# Altium PCB TIE_2025.PcbDoc (part 2 of 2)
Units mm, origin at the board's own origin, x right, y up, seen from the top; angles counter-clockwise.
Board outline 85 x 56.03 mm, 6 copper layers (Top Layer, L2-GND, L3-PWR, L4-SGN, L5-GND, Bottom Layer), stack 1.452 mm thick; 135 components, 108 nets, 850 pads, 109 vias.
Unrouted connection lines stored in the file: 482.
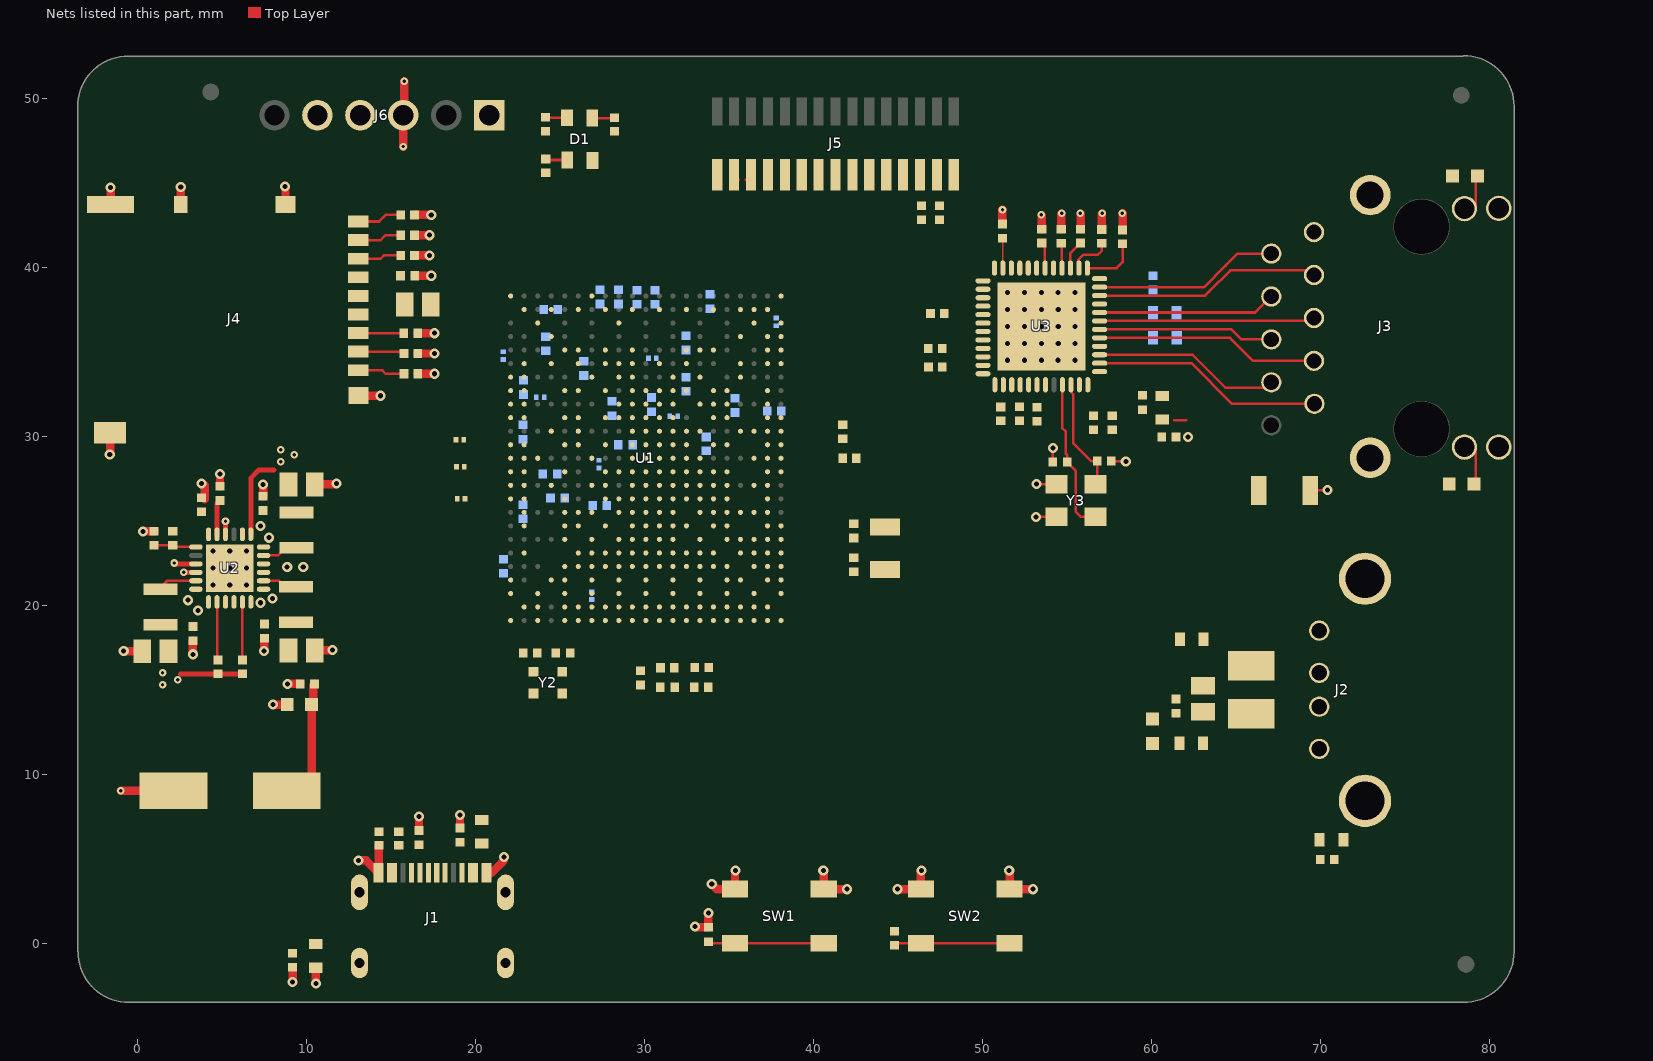
[diagram p5: the nets of this part, all layers, seen from the top]

## Part data
C1 C3 C7 C13 C14 C15 C16 C17 C19 C20 C21 C22 C23 C24 C25 C26 C27 C28 C31 C34 C37 C39 C48 C49 C50 C51 C52 C56 C59: library part C0402C104K4RAC7867, "CAP CER 0.1uF 16V 10% X7R SMD 0402", Manufacturer=KEMET, Package=0402, Rated Voltage=16V, .Checked_PCB=AI, .Checked_SCH=AI, .Creator=AI, Manufacturer Part Number=C0402C104K4RAC7867
C2 C8 C53 C54: library part QSCF500Q100J1GV001T, "CAP CER 10pF 50V 5% C0G/NP0 SMD 0402", Manufacturer="Johanson Technology", Package=0402, Rated Voltage=50V, .Checked_PCB=AI, .Checked_SCH=AI, .Creator=AI, Manufacturer Part Number=QSCF500Q100J1GV001T
C4 C9 C10 C11 C12 C40 C42 C44 C46 C47: library part C1005X5R1A475K050BC, "CAP CER 4.7uF 10V 10% X5R SMD 0402", Manufacturer="TDK Corporation", Package=0402, Rated Voltage=10V, .Checked_PCB=AI, .Checked_SCH=AI, .Creator=AI, Manufacturer Part Number=C1005X5R1A475K050BC
C5 C6: library part QSCF500Q120J1GV001T, "CAP CER 12pF 50V 5% C0G/NP0 SMD 0402", Manufacturer="Johanson Technology", Package=0402, Rated Voltage=50V, .Checked_PCB=AI, .Checked_SCH=AI, .Creator=AI, Manufacturer Part Number=QSCF500Q120J1GV001T
C18 C58: library part GRM155C71A225KE11J, "CAP CER 2.2uF 10V 10% X7S SMD 0402", Manufacturer=Murata, Package=0402, Rated Voltage=10V, .Checked_PCB=AI, .Checked_SCH=AI, .Creator=AI, Manufacturer Part Number=GRM155C71A225KE11J
C29: library part UWT1E331MNL1GS, "CAP ALU 330uF 25V 20% SMD F", Manufacturer=Nichicon, Rated Voltage=25V, Manufacturer Part Number=UWT1E331MNL1GS
C30 C38: library part GRT188R61C106KE13D, "CAP CER 10uF 16V 10% X5R SMD 0603 AEC-Q200", Manufacturer=Murata, Rated Voltage=16V, .Checked_PCB=IC, .Checked_SCH=IC, .Creator=IC, Manufacturer Part Number=GRT188R61C106KE13D, Pacakage=0603
C32 C33: library part GRM1555C1H471JA01D, "CAP CER 470pF 50V 5% NP0 SMD 0402", Manufacturer=Murata, Package=0402, Rated Voltage=50V, .Checked_PCB=AI, .Checked_SCH=AI, .Creator=AI, Manufacturer Part Number=GRM1555C1H471JA01D
C35: library part GRM32ER61A107ME20L, "CAP CER 100uF 10V 20% X5R SMD 1210", Manufacturer="Murata Electronics North", Package=1210, Rated Voltage=10V, .Checked_PCB=IC, .Checked_SCH=IC, Manufacturer Part Number=GRM32ER61A107ME20L
C36 C41 C43 C45 C57: library part C2012X7S1A226M125AC, "CAP CER 22uF 10V 20% X7S SMD 0805", Manufacturer="TDK Corporation", Package=0805, Rated Voltage=10V, Manufacturer Part Number=C2012X7S1A226M125AC
C55: library part 202R18W102KV4E, "CAP CER 1000pF 2KV 10% X7R SMD 1206", Manufacturer="D3_Johanson Dielectrics Inc", Rated Voltage=2kV, .Checked_PCB=AI, .Checked_SCH=AI, .Creator=AI, Manufacturer Part Number=202R18W102KV4E
D1: library part CLV1A-FKB-CK1VW1DE1BB7C3C3, "DIO LED TRI RED, GREEN, BLUE 2V, 3.2V, 3.2V 20mA, 20mA,  / 20mA SMD 4-PLCC", Manufacturer="Cree Inc.", .Checked_PCB=IC, .Checked_SCH=IC, Manufacturer Part Number=CLV1A-FKB-CK1VW1DE1BB7C3C3
FB1 FB2 FB3 FB4 FB5 FB6 FB7 FB8: library part BLM18PG121SN1D, "FERRITE BEAD 120 OHM 0603 1LN", Manufacturer=Murata, .Checked_PCB=AI, .Checked_SCH=AI, .Creator=AI
  FB1 FB2 FB3 FB4 FB6 FB7 FB8: Manufacturer Part Number=BLM18PG121SN1D
J1: library part USB4105-GF-A, "CONN USB2.0 TYPE-C Female SMD/TH R/A", Manufacturer=GCT, Manufacturer Part Number=USB4105-GF-A
J2: library part 292303-1, "CON USB2.0 STD-A FEMALE TH R/A", Manufacturer="TE Connectivity AMP", Manufacturer Part Number=292303-1
J3: "CON MODULAR JACK RJ45 10/100/1000 MAGNETICS 2xLEDs  / SHIELD TH R/A", Manufacturer="Pulse Electronics", Manufacturer Part Number=JXD1-0019NL
J4: "CON FLASH microSD 8+2P Push-Push SMD", Manufacturer="Hirose Electric Co Ltd", Manufacturer Part Number=DM3AT-SF-PEJM5
J5: library part 1-1734248-5, "CON FPC 1mm 15P Female SMD VERT", Manufacturer="TE Connectivity AMP", Manufacturer Part Number=1-1734248-5
J6: library part 68001-106HLF, "CON HDR-2.54 Male 1x6 Gold 5.84MH TH VERT", Manufacturer=FCI, Manufacturer Part Number=68001-106HLF
L1 L2 L3: library part DFE252012P-1R5M=P2, "INDUCTOR 1.5uH 3.5A 20% SMD 1008", Manufacturer="Murata Electronics North", Manufacturer Part Number=DFE252012P-1R5M=P2, .Checked_PCB=AI, .Checked_SCH=AI, .Creator=AI
R1 R14 R15 R16 R17 R22 R23 R24 R25 R26 R27 R28 R29 R30 R31: library part ERJ-2RKF1002X, "RES TKF 10k 1% 1/10W SMD 0402", Manufacturer=Panasonic, Package=0402, Tolerance=1%, Manufacturer Part Number=ERJ-2RKF1002X
R2 R3 R4: library part CR0201-FW-2000GLF, "RES TKF 200R 1% 1/20W SMD 0201", Manufacturer="Bourns Inc.", Package=0201, Tolerance=1%, Manufacturer Part Number=CR0201-FW-2000GLF
R5 R6 R7 R8: library part ERJ-1GNF1692C, "RES TKF 16.9k 1% 1/20W SMD 0201", Manufacturer="Panasonic Electronic", Package=0201, Tolerance=1%, Manufacturer Part Number=ERJ-1GNF1692C
R9: library part RC0201FR-074K02L, "RES TKF 4.02k 1% 1/20W SMD 0201", Manufacturer=Yageo, Package=0201, Tolerance=1%, Manufacturer Part Number=RC0201FR-074K02L
R10 R11 R32 R33 R34 R35 R45 R46 R47: library part ERJ-2RKF1001X, "RES TKF 1k 1% 1/10W SMD 0402", Manufacturer=Panasonic, Package=0402, Tolerance=1%, Manufacturer Part Number=ERJ-2RKF1001X
R12 R13: library part RC0201FR-07240RL, "RES TKF 240R 1% 1/20W SMD 0201", Manufacturer=Yageo, Package=0201, Tolerance=1%, Manufacturer Part Number=RC0201FR-07240RL
R18 R19 R37 R38 R39 R40 R41 R42: library part ERJ-2RKF4702X, "RES TKF 47k 1% 1/10W SMD 0402 AEC-Q200", Manufacturer="Panasonic - ECG", Package=0402, Tolerance=1%, Manufacturer Part Number=ERJ-2RKF4702X
R20 R21: library part ERJ-3EKF3300V, "RES TKF 330R 1% 1/10W SMD 0603", Manufacturer=Panasonic, Package=0603, Tolerance=1%, .Checked_PCB=IC, .Checked_SCH=IC, .Creator=IC, Manufacturer Part Number=ERJ-3EKF3300V
R36: library part ERJ-2RKF6041X, "RES TKF 6.04k 1% 1/10W SMD 0402 AEC-Q200", Manufacturer="Panasonic Electronic", Package=0402, Tolerance=1%, Manufacturer Part Number=ERJ-2RKF6041X
R43 R44: library part ERJ-2RKF2201X, "RES TKF 2.2k 1% 1/10W SMD 0402", Manufacturer=Panasonic, Package=0402, Tolerance=1%, Manufacturer Part Number=ERJ-2RKF2201X
SW1 SW2: "SWITCH TACT SPST 12V 50mA PTS 647 SK38 SMTR2 LFSSMD", Arrow Part Number="PTS 647 SK38 SMTR2 LFS", Manufacturer=C&K, Arrow Price/Stock=https://www.arrow.com/en/products/pts-647-sk38-smtr2-lfs/ck?region=europe, Datasheet Link=https://datasheet.datasheetarchive.com/originals/distributors/Datasheets_SAMA/dda6c2a9a64375c9ffe9508ecade46cd.pdf, Height=3.8mm, Manufacturer Part Number="PTS 647 SK38 SMTR2 LFS"
U1: "MCHP MPU SiP 32-BIT Cortex-A7 1000MHz 128kB 2Gbit  / SAMA7G54D2G-I/4UB LFBGA-427", Manufacturer="Microchip Technology", Manufacturer Part Number=SAMA7G54DG-I/4UB
U2: "MCHP ANALOG PMIC SWITCHER Buck ADJ MCP16501TA-E/RMB  / QFN-24", Manufacturer="Microchip Technology", Manufacturer Part Number=MCP16501TA-E/RMB
U3: "MCHP INTERFACE ETHERNET LAN8840 QFN-48", Manufacturer="Microchip Technology", Manufacturer Part Number=LAN8840-V/PSA
Y1: library part VMK4-1EE-12-32K7680000TR, "MCHP CRYSTAL 32.768kHz 12.5pF VMK4-1EE-12-32K7680000TR  / SMD L2.0W1.2H0.5", Manufacturer="Microchip Technology", Manufacturer Part Number=VMK4-1EE-12-32K7680000TR
Y2: library part VXM8-9016-24M0000000, "MCHP CRYSTAL 24MHz 10pF VXM8-9016-24M000000 SMD  / L2.5W2H0.55", Manufacturer="Microchip Technology", Manufacturer Part Number=VXM8-9016-24M0000000
Y3: library part VXM7-1362-50M0000000, "MCHP CRYSTAL 50MHz VXM7-1362-50M0000000 SMD  / L3.2W2.5H0.8", Manufacturer="Microchip Technology", Manufacturer Part Number=VXM7-1362-50M0000000

## Via types
v1: diameter 0.6, hole 0.3, Top Layer to L2-GND, 40 vias
v2: diameter 0.5, hole 0.3, Top Layer to Bottom Layer, tented both sides, 34 vias
v3: diameter 0.45, hole 0.2, Top Layer to Bottom Layer, 18 vias
v4: diameter 0.6, hole 0.3, Top Layer to Bottom Layer, 11 vias
v5: diameter 0.6, hole 0.3, Top Layer to L3-PWR, 6 vias

## Nets (pads, with @x,y where several pads share a name; then routed paths per layer and width w, separated by ;. In a path a pad name is that pad's centre, name@x,y a point inside that pad or via, vN(x,y) a via of type N, cw(c..) or ccw(c..) an arc to the next point about the centre after c; other vN are vias at no path point)
5V_MAIN: C29.1 C30.2 C31.2 C38.2 C40.2 C42.2 C44.2 C46.2 FB1.2 FB3.2 U2.7 U2.12 U2.17 U2.21 U2.24 | length 10.8
  Top Layer w0.3: v3(2.2,22.5) 2.25,22.45 U2.21@3.475,22.45 ; U2.17@4.725,24.2 4.725,26.025 C46.2@4.9,26.2
  Top Layer w0.5: C29.1@8.825,9.025 9.495,9.025 10.32,9.85 C30.2@10.32,14.125 10.408,14.213 10.408,15.255 10.49,15.338 C31.2@10.49,15.35
  other v5: 3.6,19.7 7.3,20.15 3,20.3 8,20.4 7.8,24 7.3,24.7
CAM_GPIO0: J5.11 U1.T18
CAM_GPIO1: J5.12 U1.R21
CAM_TWCK: J5.13 R43.2 U1.D11
CAM_TWD: J5.14 R44.2 U1.A3
DBGU_RX: J6.4 U1.J20
DBGU_TX: J6.5 U1.G25
DDR_VREF: C3.1 C7.2 R10.1 R11.2 U1.E4 U1.R12
ETH_ISET: R36.2 U3.48
GMAC0_IRQ: R26.1 U1.F15 U3.39
GMAC0_MDC: U1.AA13 U3.37
GMAC0_MDIO: R25.1 U1.W15 U3.38
GMAC0_RX0: R32.2 U1.U17 U3.33
GMAC0_RX1: R33.2 U1.AA12 U3.32
GMAC0_RX2: R34.2 U1.T17 U3.30
GMAC0_RX3: R22.1 U1.AA16 U3.29
GMAC0_RXCK: R23.1 U1.Y14 U3.36
GMAC0_RXCTL: R35.2 U1.Y13 U3.34
GMAC0_TX0: U1.Y15 U3.19
GMAC0_TX1: U1.W13 U3.20
GMAC0_TX2: U1.AA14 U3.21
GMAC0_TX3: U1.AA15 U3.22
GMAC0_TXEN: U1.V15 U3.26
GMACH0_TXCK: U1.Y17 U3.25
GND: C1.1 C2.1 C4.1 C5.1 C6.1 C7.1 C8.1 C9.1 C10.1 C11.1 C12.1 C13.1 C14.1 C15.1 C16.1 C17.1 C18.1 C19.1 C20.1 C21.1 C22.1 C23.1 C24.1 C25.1 C26.1 C27.1 C28.1 C29.2 C30.1 C31.1 C32.1 C33.1 C34.2 C38.1 C40.1 C41.2 C42.1 C43.2 C44.1 C45.2 C46.1 C47.1 C48.1 C49.2 C50.2 C51.1 C52.2 C53.1 C54.1 C55.1 C56.1 C57.1 C58.1 C59.1 FB2.2 FB4.2 FB5.1 J1.A1/B12 J1.B1/A12 J3.1 J4.G1 J4.G2 J4.G3 J4.G5 J4.G6 J4.P6 J5.1 J5.4 J5.7 J5.10 J6.1 R2.2 R3.2 R4.2 R5.1 R6.1 R7.1 R8.1 R9.2 R11.1 R12.2 R13.2 R15.1 R19.2 R32.1 R33.1 R34.1 R35.1 R36.1 SW1.1 SW1.2 SW2.1 SW2.2 U1.A1 U1.A25 U1.AA1 U1.AA4 U1.AA6 U1.AA8 U1.AA25 U1.B2 U1.B16 U1.B24 U1.C3 U1.C23 U1.D4 U1.D20 U1.D22 U1.E2 U1.E5 U1.E8 U1.E10 U1.E12 U1.E14 U1.E16 U1.E18 U1.E21 U1.F1 U1.F9 U1.F20 U1.G2 U1.G3 U1.G5 U1.G7 U1.G9 U1.H1 U1.H5 U1.H8 U1.H10 U1.H14 U1.H16 U1.H18 U1.H21 U1.J1 U1.J3 U1.J5 U1.J7 U1.J9 U1.J10 U1.J16 U1.K2 U1.K8 U1.K10 U1.K11 U1.K13 U1.K15 U1.K21 U1.L1 U1.L3 U1.L5 U1.L7 U1.L8 U1.L12 U1.L14 U1.L16 U1.L17 U1.L18 U1.M2 U1.M5 U1.M6 U1.M8 U1.M11 U1.M13 U1.M15 U1.M17 U1.M18 U1.N1 U1.N2 U1.N4 U1.N7 U1.N9 U1.N10 U1.N12 U1.N14 U1.N16 U1.N18 U1.P2 U1.P5 U1.P8 U1.P11 U1.P13 U1.P18 U1.P24 U1.R1 U1.R3 U1.R6 U1.R7 U1.R10 U1.R11 U1.R19 U1.T2 U1.T5 U1.T9 U1.T11 U1.T12 U1.T21 U1.U1 U1.U3 U1.U8 U1.U10 U1.U11 U1.U12 U1.U14 U1.U16 U1.U18 U1.V2 U1.V4 U1.V7 U1.V9 U1.V20 U1.V22 U1.V24 U1.W1 U1.W3 U1.W5 U1.W11 U1.W23 U1.Y2 U1.Y5 U1.Y7 U1.Y10 U1.Y12 U1.Y24 U2.9 U2.10 U2.16 U2.22 U2.25 U3.49 Y2.3 Y2.4 Y3.2 Y3.4 | length 46.2
  Top Layer w0.15: v1(-0.8,17.3) v1@-0.775,17.275 ; v1(0.35,24.375) v1@0.357,24.382 ; v1(7.5,17.3) v1@7.525,17.325 ; C43.2@10.5,17.325 C43.2@10.95,17.35 ; J1.A1/B12@14.28,4.165 J1.A1/B12@14.3,4.185 ; v1@21.7,4.9 v1(21.7,5.1) ; v1(33,1) v1@33.06,0.94 ; v1(53.175,25.225) 53.2,25.25 Y3.2@54.4,25.25 ; v1(53.225,27.175) 53.25,27.15 Y3.4@54.4,27.15 ; C53.1@54.185,28.475 54.185,29.285 v1(54.2,29.3) ; C54.1@57.645,28.525 58.475,28.525 v1(58.5,28.5) ; 61.37,30.95 62.075,30.95 ; C55.1@69.423,26.8 70.4,26.8 v1(70.425,26.825)
  Top Layer w0.3: v3(2.75,21.95) U2.22@3.475,21.95 ; U2.16@5.225,24.2 v3(5.225,24.975)
  Top Layer w0.5: v1@-1.6,28.95 J4.G6@-1.6,30.21 ; J4.G3@-1.575,43.71 v1(-1.575,44.725) ; v3(-0.975,9.025) C29.2@2.15,9.025 ; v1@-0.775,17.275 C41.2@0.3,17.275 ; v1@0.357,24.382 R19.2@1.003,24.382 ; J4.G2@2.575,43.71 v1(2.575,44.75) ; v1(3.3,17.1) C40.1@3.3,17.905 ; C47.1@4,26.27 v1@4,27.1 ; C46.1@4.9,27.04 v1(4.9,27.77) ; C44.1@7.45,26.45 v1(7.45,27.15) ; v1@7.525,17.325 C42.1@7.525,18.055 ; v1(8.025,14.125) C30.1@8.88,14.125 ; J4.G1@8.775,43.71 v1@8.775,44.75 ; v1(8.9,15.35) C31.1@9.65,15.35 ; v1(9.2,-2.3) C34.2@9.2,-1.42 ; C45.2@10.5,27.15 11.75,27.15 v1(11.8,27.2) ; v1(10.575,-2.375) FB2.2@10.575,-1.45 ; C43.2@10.95,17.35 v1(11.55,17.35) ; v1(13.1,4.9) 13.545,4.9 J1.A1/B12@14.28,4.165 ; J4.G5@13.1,32.41 v1@14.39,32.41 ; J1.A1/B12@14.3,4.185 R15.1@14.3,5.79 ; C32.1@16.675,6.675 v1(16.675,7.5) ; C33.1@19.1,6.82 v1(19.1,7.6) ; J1.B1/A12@20.675,4.165 20.965,4.165 v1@21.7,4.9 ; v1@33.06,0.94 C58.1@33.8,0.94 v1(33.8,1.8) ; v1(34,3.5) 34.3,3.2 SW1.1@35.375,3.2 v1@35.375,4.275 ; v1@40.625,4.275 SW1.2@40.625,3.2 v1(42,3.2) ; v1(45,3.2) SW2.1@46.375,3.2 v1@46.375,4.275 ; C48.1@51.2,42.565 v3(51.2,43.4) ; v1@51.625,4.275 SW2.2@51.625,3.2 v1(53,3.2)
  other v1: 35.4,4.3 40.6,4.3 46.4,4.3 51.6,4.3 8.875,22.275 9.825,22.275 3.8,27.2 -1.625,28.925 62.175,29.95 14.4,32.4 8.75,44.775
  other v2: 4.475,21.2 5.475,21.2 6.475,21.2 4.475,22.2 5.475,22.2 6.475,22.2 4.475,23.2 5.475,23.2 6.475,23.2 51.5,34.5 52.5,34.5 53.5,34.5 54.5,34.5 55.5,34.5 51.5,35.5 52.5,35.5 53.5,35.5 54.5,35.5 55.5,35.5 51.5,36.5 52.5,36.5 53.5,36.5 54.5,36.5 55.5,36.5 51.5,37.5 52.5,37.5 53.5,37.5 54.5,37.5 55.5,37.5 51.5,38.5 52.5,38.5 53.5,38.5 54.5,38.5 55.5,38.5
GND_USBA: C34.1 C55.2 FB2.1 J1.25 J3.0
GND_USBB: C39.2 FB5.2 J2.0
LED1: R20.1 R29.1 U3.18 | length 1.6
  Top Layer w0.15: R29.1@53.525,41.44 53.7,41.265 U3.18@53.7,39.95
LED2: R21.1 R30.1 U3.16 | length 1.5
  Top Layer w0.15: R30.1@54.677,41.425 54.7,41.402 U3.16@54.7,39.95
LED_BLUE: R45.1 U1.W24
LED_GREEN: R46.1 U1.J23
LED_RED: R47.1 U1.K19
LPM: U1.P15 U2.4
MIPI_CK_N: J5.8 U1.Y21 | length 0
  Top Layer w0.15: J5.8@41.297,45.477 J5.8@41.327,45.448
MIPI_CK_P: J5.9 U1.AA21
MIPI_D0_N: J5.2 U1.Y22 | length 0.4
  Top Layer w0.15: J5.2@35.297,45.477 J5.2@35.595,45.179
MIPI_D0_P: J5.3 U1.AA22 | length 0.4
  Top Layer w0.15: 35.999,45.179 J5.3@36.297,45.477
MIPI_D1_N: J5.5 U1.Y20
MIPI_D1_P: J5.6 U1.AA20 | length 0.2
  Top Layer w0.15: J5.6@39.161,45.341 J5.6@39.297,45.477
NetC48_2: C48.2 U3.23 | length 1.8
  Top Layer w0.1: C48.2@51.2,41.725 51.225,41.7 U3.23@51.225,39.95
NetD1_1: D1.1 R45.2 | length 1.3
  Top Layer w0.15: R45.2@24.175,46.41 24.235,46.35 D1.1@25.45,46.35
NetD1_3: D1.3 R46.2 | length 1.3
  Top Layer w0.15: D1.3@26.925,48.825 28.215,48.825 R46.2@28.25,48.86
NetD1_4: D1.4 R47.2 | length 1.3
  Top Layer w0.15: R47.2@24.15,48.87 24.17,48.85 D1.4@25.425,48.85
NetJ3_12: J3.12 R21.2 | length 2
  Top Layer w0.15: 79.2,43.488 79.2,45.287 R21.2@79.313,45.4
NetJ3_14: J3.14 R20.2 | length 2.2
  Top Layer w0.15: R20.2@79.113,27.175 79.2,27.262 79.2,29.362
NetR2_1: R2.1 U1.A10
NetR3_1: R3.1 U1.A12
NetR4_1: R4.1 U1.A14
NetR5_2: R5.2 U1.R17
NetR6_2: R6.2 U1.M20
NetR7_2: R7.2 U1.F18
NetR8_2: R8.2 U1.B20
NetR9_1: R9.1 U1.AA23
NetR12_1: R12.1 U1.G4
NetR13_1: R13.1 U1.J12
NetR18_1: R18.1 R19.1 U2.19 | length 2.5
  Top Layer w0.15: R19.1@1.003,23.562 R18.1@2.103,23.562 2.215,23.45 U2.19@3.475,23.45
NetR22_2: R22.2 R23.2 R24.2 R25.2 R26.2
NetR24_1: R24.1 U3.42
NetR27_1: R27.1 U3.14 | length 2.5
  Top Layer w0.15: U3.14@55.7,39.95 55.7,40.45 56,40.75 56.85,40.75 57.075,40.975 R27.1@57.075,41.415
NetR28_1: R28.1 U3.13 | length 3.3
  Top Layer w0.15: U3.13@56.2,39.95 57.95,39.95 58.309,40.309 R28.1@58.309,41.387
NetR31_1: R31.1 U3.15 | length 1.7
  Top Layer w0.15: U3.15@55.2,39.95 55.2,40.815 R31.1@55.825,41.44
NRST: C59.2 R17.1 SW2.3 SW2.4 U1.G13 U2.2 | length 10.3
  Top Layer w0.15: U2.2@4.725,20.2 4.725,16.81 R17.1@4.775,16.76 ; C59.2@44.8,-0.12 44.92,0 SW2.3@46.375,0 SW2.4@51.625,0
NRST_OUT: R1.1 U1.B9 U3.43
nSTART: C58.2 SW1.3 SW1.4 U2.14 | length 6.9
  Top Layer w0.15: C58.2@33.8,0.1 33.9,0 SW1.3@35.375,0 SW1.4@40.625,0
SDMMC1_CD: J4.G4 R42.1 U1.H11 | length 2.7
  Top Layer w0.15: J4.G4@13.072,42.71 14.31,42.71 14.7,43.1 R42.1@15.59,43.1
SDMMC1_CK: J4.P5 U1.A16
SDMMC1_CMD: J4.P3 R41.1 U1.A19 | length 2.7
  Top Layer w0.15: J4.P3@13.072,36.11 15.77,36.11 R41.1@15.78,36.1
SDMMC1_DAT0: J4.P7 R37.1 U1.B19 | length 2.6
  Top Layer w0.15: J4.P7@13.072,40.51 14.41,40.51 14.6,40.7 R37.1@15.59,40.7
SDMMC1_DAT1: J4.P8 R38.1 U1.A18 | length 2.6
  Top Layer w0.15: J4.P8@13.072,41.61 14.41,41.61 14.7,41.9 R38.1@15.59,41.9
SDMMC1_DAT2: J4.P1 R39.1 U1.A17 | length 2.8
  Top Layer w0.15: J4.P1@13.072,33.91 14.49,33.91 14.7,33.7 R39.1@15.79,33.7
SDMMC1_DAT3: J4.P2 R40.1 U1.B17 | length 2.8
  Top Layer w0.15: J4.P2@13.072,35.01 15.68,35.01 R40.1@15.79,34.9
SHDN: U1.R15 U2.3
SW1: L1.1 U2.23 | length 2.2
  Top Layer w0.15: L1.1@1.4,21.075 1.731,21.406 cw(c1.837,21.3) 1.837,21.45 U2.23@3.475,21.45
SW2: L2.1 U2.8 | length 2.1
  Top Layer w0.15: U2.8@7.475,21.45 8.4,21.45 8.75,21.1 L2.1@9.4,21.1
SW3: L3.1 U2.11 | length 2.1
  Top Layer w0.15: U2.11@7.475,22.95 8.325,22.95 8.775,23.4 L3.1@9.425,23.4
TXRX_A_N: J3.8 U3.3 | length 11.1
  Top Layer w0.15: U3.3@56.95,34.825 62.446,34.825 64.386,32.886 66.805,32.886 J3.8@67.111,33.192
TXRX_A_P: J3.9 U3.2 | length 13.7
  Top Layer w0.15: U3.2@56.95,34.325 62.375,34.325 64.778,31.922 J3.9@69.661,31.922
TXRX_B_N: J3.6 U3.6 | length 10.4
  Top Layer w0.15: U3.6@56.95,36.325 64.746,36.325 65.339,35.732 J3.6@67.111,35.732
TXRX_B_P: J3.7 U3.5 | length 13.3
  Top Layer w0.15: U3.5@56.95,35.825 64.675,35.825 66.038,34.462 J3.7@69.636,34.462
TXRX_C_N: J3.4 U3.8 | length 10.6
  Top Layer w0.15: U3.8@56.95,37.325 66.148,37.325 66.229,37.406 66.245,37.406 J3.4@67.111,38.272
TXRX_C_P: J3.5 U3.7 | length 12.8
  Top Layer w0.15: U3.7@56.95,36.825 69.459,36.825 J3.5@69.636,37.002
TXRX_D_N: J3.2 U3.11 | length 11
  Top Layer w0.15: U3.11@56.95,38.825 63.125,38.825 63.145,38.845 64.4,40.1 65.112,40.812 J3.2@67.111,40.812
TXRX_D_P: J3.3 U3.10 | length 13.4
  Top Layer w0.15: U3.10@56.95,38.325 63.196,38.325 63.431,38.559 64.686,39.814 69.364,39.814 J3.3@69.636,39.542
USBA_CC1: C32.2 J1.A5 U1.C13
USBA_CC2: C33.2 J1.B5 U1.D15
USBA_N: J1.A7 J1.B7 U1.B11
USBA_P: J1.A6 J1.B6 U1.A11
USBA_VBUS_5V: FB1.1 J1.A4/B9 J1.B4/A9 R14.2 | length 0
  Top Layer w0.5: R14.2@15.475,5.79 R14.2@15.49,5.79
USBA_VBUS_DETECT: R14.1 R15.2
USBB_GND: C35.1 C36.1 C37.1 C39.1 FB4.1 J2.4
USBB_N: J2.2 U1.B13
USBB_P: J2.3 U1.A13
USBB_VBUS_5V: C35.2 C36.2 C37.2 FB3.1 J2.1
VDD_1V8: C47.2 R18.2 U2.18
VDD_2V5: C1.2 C17.2 C18.2 C20.2
VDD_3V3: C9.2 C10.2 C16.2 C19.2 C21.2 C22.2 C23.2 C24.2 C25.2 C26.2 C27.2 C28.2 C41.1 C51.2 C56.2 C57.2 D1.2 FB6.1 J3.11 J3.13 J4.P4 J5.15 J6.3 L1.2 R1.2 R16.2 R17.2 R27.2 R28.2 R29.2 R30.2 R31.2 R37.2 R38.2 R39.2 R40.2 R41.2 R42.2 R43.1 R44.1 U1.B8 U1.B10 U1.B12 U1.B14 U1.B18 U1.D24 U1.F14 U1.F16 U1.F24 U1.H24 U1.K16 U1.K24 U1.M24 U1.P20 U1.Y16 U1.Y18 U2.1 U3.17 U3.24 U3.28 U3.35 U3.41 | length 18.9
  Top Layer w0.3: 2.56,15.94 R17.2@4.775,15.94 R16.2@6.225,15.94
  Top Layer w0.5: v3(15.745,47.145) J6.3@15.745,49 15.8,49.055 v3(15.8,51) ; R37.2@16.41,40.7 v4(17.3,40.7) ; R38.2@16.41,41.9 v4(17.3,41.9) ; R42.2@16.41,43.1 v4(17.4,43.1) ; C56.2@16.42,39.5 v4(17.4,39.5) ; R41.2@16.6,36.1 v4(17.6,36.1) ; R39.2@16.61,33.7 v4(17.6,33.7) ; R40.2@16.61,34.9 v4(17.6,34.9) ; R29.2@53.525,42.26 v3@53.525,43.075 ; R30.2@54.677,42.245 v3@54.677,43.177 ; R31.2@55.825,42.26 v3@55.825,43.175 ; R27.2@57.075,42.235 v3@57.075,43.175 ; R28.2@58.309,42.207 v3@58.309,43.191
  other v3: 1.5,15.3 2.4,15.6 1.5,16 53.5,43.1 54.7,43.2 55.8,43.2 57.1,43.2 58.3,43.2
VDDAH: C49.1 FB6.2 U3.1 U3.12
VDDAL: C50.1 FB7.2 FB8.1 U3.4 U3.9
VDDAL_PLL: C52.1 FB8.2 U3.47
VDDCORE: C11.2 C12.2 C13.2 C14.2 C15.2 C45.1 FB7.1 L3.2 U1.F21 U1.G11 U1.G19 U1.H12 U1.H20 U1.J17 U1.J19 U1.K17 U1.K18 U1.K20 U1.L13 U1.M12 U1.N17 U1.N19 U1.P21 U1.T14 U1.T16 U1.T24 U1.V19 U2.13 U3.27 U3.31 U3.40 | length 4.9
  Top Layer w0.3: U2.13@6.725,24.2 6.725,27.525 7.2,28 8.1,28
  other v3: 8.5,28.5 9.3,28.9 8.5,29.2
VDDIODDR: C3.2 C4.2 C43.1 L2.2 R10.2 U1.A4 U1.AA3 U1.AA7 U1.B6 U1.E1 U1.E3 U1.E7 U1.E9 U1.F2 U1.F5 U1.F6 U1.F8 U1.G1 U1.G6 U1.H2 U1.H6 U1.J2 U1.J4 U1.J6 U1.K1 U1.K5 U1.K6 U1.K7 U1.K9 U1.K12 U1.K14 U1.L2 U1.L4 U1.L6 U1.L9 U1.L10 U1.L11 U1.L15 U1.M1 U1.M7 U1.M9 U1.M10 U1.M14 U1.M16 U1.N3 U1.N5 U1.N6 U1.N8 U1.N11 U1.N13 U1.N15 U1.P1 U1.P6 U1.P10 U1.P12 U1.P14 U1.R2 U1.R4 U1.R5 U1.R9 U1.R13 U1.T1 U1.T6 U1.T8 U1.T10 U1.U2 U1.U4 U1.U5 U1.U7 U1.U9 U1.V1 U1.V6 U1.W2 U1.W6 U1.W7 U1.W9 U1.Y1 U1.Y4 U1.Y6 U1.Y8 U2.6
WKUP: R16.1 U1.Y11 U2.5 | length 3.4
  Top Layer w0.15: R16.1@6.225,16.76 U2.5@6.225,20.2
XIN24M: C2.2 U1.C2 Y2.1
XIN32K: C5.2 U1.Y9 Y1.1
XIN_25M: C54.2 U3.46 Y3.3 | length 6.8
  Top Layer w0.15: U3.46@55.225,33.05 55.3,32.975 55.3,32.574 55.4,32.474 55.4,29.575 56.45,28.525 C54.2@56.805,28.525 56.805,27.255 Y3.3@56.7,27.15
XOUT24M: C8.2 U1.C1 Y2.2
XOUT32K: C6.2 U1.AA5 Y1.2
XOUT_25M: C53.2 U3.45 Y3.1 | length 9.1
  Top Layer w0.15: U3.45@54.725,33.05 54.725,30.5 54.95,30.275 54.95,28.974 55.025,28.899 C53.2@55.025,28.475 55.55,27.95 55.55,25.525 55.825,25.25 Y3.1@56.7,25.25
pads on no net: "FEDUCIAL 1.1" "Feducial 2.1" "Feducial 3.1" J1.A8 J1.B8 J3. J3.10 J5. J6.2 J6.6 U1.A5 U1.A6 U1.A7 U1.A8 U1.A9 U1.A15 U1.A20 U1.A21 U1.A22 U1.A23 U1.AA9 U1.AA10 U1.AA11 U1.AA17 U1.AA18 U1.AA19 U1.B1 U1.B4 U1.B5 U1.B7 U1.B15 U1.B21 U1.B22 U1.B25 U1.C5 U1.C7 U1.C9 U1.C11 U1.C15 U1.C17 U1.C19 U1.C21 U1.C24 U1.C25 U1.D1 U1.D2 U1.D7 U1.D9 U1.D13 U1.D17 U1.D19 U1.D25 U1.E11 U1.E13 U1.E15 U1.E17 U1.E19 U1.E22 U1.E23 U1.E24 U1.E25 U1.F10 U1.F11 U1.F12 U1.F13 U1.F17 U1.F25 U1.G15 U1.G17 U1.G20 U1.G21 U1.G22 U1.G23 U1.G24 U1.H13 U1.H15 U1.H25 U1.J11 U1.J13 U1.J14 U1.J15 U1.J18 U1.J21 U1.J22 U1.J24 U1.J25 U1.K25 U1.L19 U1.L20 U1.L21 U1.L22 U1.L23 U1.L24 U1.L25 U1.M19 U1.M21 U1.M25 U1.N20 U1.N21 U1.N22 U1.N23 U1.N24 U1.N25 U1.P16 U1.P25 U1.R20 U1.R22 U1.R23 U1.R24 U1.R25 U1.T13 U1.T15 U1.T20 U1.T25 U1.U13 U1.U15 U1.U19 U1.U21 U1.U22 U1.U23 U1.U24 U1.U25 U1.V11 U1.V13 U1.V17 U1.V25 U1.W17 U1.W19 U1.W20 U1.W21 U1.W25 U1.Y19 U1.Y25 U2.15 U2.20 U3.44
copper on no net:
  other v4: 0,0 57.975,0 -0.025,49 57.975,49

## Polygon pours and split planes (outlines as drawn)
5V_MAIN on Top Layer "5V_MAIN_L01_P004" (solid, remove dead copper, pour order 4): 6.843,26.25 8.075,26.25 8.075,23.125 6.901,23.125
VDDCORE on Top Layer "VDDCORE_L01_P002" (solid, remove dead copper, pour order 2): 11.967,24.723 7.967,24.723 7.967,29.5 9.852,29.5 9.852,26.673 11.967,26.673
VDDIODDR on Top Layer "VDDIODDR_L01_P001" (solid, remove dead copper, pour order 1): 7.85,15.96 7.85,19.96 12.271,19.96 12.271,18.075 9.8,18.075 9.8,15.96
VDD_3V3 on Top Layer "VDD_3V3_L01_P000" (solid, remove dead copper, pour order 0): -0.875,19.85 2.725,19.85 3.125,19.45 3.125,14.9 1,14.9 1,18.325 -0.85,18.325 -0.875,18.35
5V_MAIN on Top Layer "5V_MAIN_L01_P006" (solid, remove dead copper, pour order 6): 2.643,21.35 4,21.35 4,18.225 2.701,18.225
GND on Top Layer "GND_L01_P007" (solid, remove dead copper, pour order 7): 6.868,22.75 10.75,22.75 10.75,21.6 10.7,21.55 6.868,21.55
5V_MAIN on Top Layer "5V_MAIN_L01_P005" (solid, remove dead copper, pour order 5): 6.868,21.55 8.1,21.55 8.1,18.425 6.868,18.425
VDD_1V8 on Top Layer "VDD_1V8_L01_P003" (solid, remove dead copper, pour order 3): 1.6,25.775 1.625,25.8 4.3,25.8 4.3,23.9 4.25,23.9 1.575,23.9
VDD_3V3 on L3-PWR (split plane): 78.692,52.007 78.908,51.979 79.12,51.932 79.327,51.867 79.528,51.783 79.721,51.683 79.904,51.566 80.077,51.434 80.237,51.287 80.384,51.127 80.516,50.954 80.633,50.771 80.733,50.578 80.817,50.377 80.882,50.17 80.929,49.958 80.957,49.742 80.966,49.541 80.965,49.525 80.965,-0.5 80.966,-0.516 80.957,-0.717 80.929,-0.933 80.882,-1.145 80.817,-1.352 80.733,-1.553 80.633,-1.746 80.516,-1.929 80.384,-2.102 80.237,-2.262 80.077,-2.409 79.904,-2.541 79.721,-2.658 79.528,-2.758 79.327,-2.842 79.12,-2.907 78.908,-2.954 78.692,-2.982 78.491,-2.991 78.475,-2.99 -0.5,-2.99 -0.516,-2.991 -0.717,-2.982 -0.933,-2.954 -1.145,-2.907 -1.352,-2.842 -1.553,-2.758 -1.746,-2.658 -1.929,-2.541 -2.102,-2.409 -2.262,-2.262 -2.409,-2.102 -2.541,-1.929 -2.658,-1.746 -2.758,-1.553 -2.842,-1.352 -2.907,-1.145 -2.954,-0.933 -2.982,-0.717 -2.991,-0.516 -2.99,-0.5 -2.999,-0.4 -3.015,-0.35 -3.015,49.5 -3.016,49.516 -3.007,49.717 -2.979,49.933 -2.932,50.145 -2.867,50.352 -2.783,50.553 -2.683,50.746 -2.566,50.929 -2.434,51.102 -2.287,51.262 -2.127,51.409 -1.954,51.541 -1.771,51.658 -1.578,51.758 -1.377,51.842 -1.17,51.907 -0.958,51.954 -0.742,51.982 -0.541,51.991 -0.525,51.99 78.475,51.99 78.575,51.999 78.612,52.011
GND on L2-GND (split plane): 78.692,52.007 78.908,51.979 79.12,51.932 79.327,51.867 79.528,51.783 79.721,51.683 79.904,51.566 80.077,51.434 80.237,51.287 80.384,51.127 80.516,50.954 80.633,50.771 80.733,50.578 80.817,50.377 80.882,50.17 80.929,49.958 80.957,49.742 80.966,49.541 80.965,49.525 80.965,-0.5 80.966,-0.516 80.957,-0.717 80.929,-0.933 80.882,-1.145 80.817,-1.352 80.733,-1.553 80.633,-1.746 80.516,-1.929 80.384,-2.102 80.237,-2.262 80.077,-2.409 79.904,-2.541 79.721,-2.658 79.528,-2.758 79.327,-2.842 79.12,-2.907 78.908,-2.954 78.692,-2.982 78.491,-2.991 78.475,-2.99 -0.5,-2.99 -0.516,-2.991 -0.717,-2.982 -0.933,-2.954 -1.145,-2.907 -1.352,-2.842 -1.553,-2.758 -1.746,-2.658 -1.929,-2.541 -2.102,-2.409 -2.262,-2.262 -2.409,-2.102 -2.541,-1.929 -2.658,-1.746 -2.758,-1.553 -2.842,-1.352 -2.907,-1.145 -2.954,-0.933 -2.982,-0.717 -2.991,-0.516 -2.99,-0.5 -2.999,-0.4 -3.015,-0.35 -3.015,49.5 -3.016,49.516 -3.007,49.717 -2.979,49.933 -2.932,50.145 -2.867,50.352 -2.783,50.553 -2.683,50.746 -2.566,50.929 -2.434,51.102 -2.287,51.262 -2.127,51.409 -1.954,51.541 -1.771,51.658 -1.578,51.758 -1.377,51.842 -1.17,51.907 -0.958,51.954 -0.742,51.982 -0.541,51.991 -0.525,51.99 78.475,51.99 78.575,51.999 78.612,52.011
GND on L5-GND (split plane): 78.692,52.007 78.908,51.979 79.12,51.932 79.327,51.867 79.528,51.783 79.721,51.683 79.904,51.566 80.077,51.434 80.237,51.287 80.384,51.127 80.516,50.954 80.633,50.771 80.733,50.578 80.817,50.377 80.882,50.17 80.929,49.958 80.957,49.742 80.966,49.541 80.965,49.525 80.965,-0.5 80.966,-0.516 80.957,-0.717 80.929,-0.933 80.882,-1.145 80.817,-1.352 80.733,-1.553 80.633,-1.746 80.516,-1.929 80.384,-2.102 80.237,-2.262 80.077,-2.409 79.904,-2.541 79.721,-2.658 79.528,-2.758 79.327,-2.842 79.12,-2.907 78.908,-2.954 78.692,-2.982 78.491,-2.991 78.475,-2.99 -0.5,-2.99 -0.516,-2.991 -0.717,-2.982 -0.933,-2.954 -1.145,-2.907 -1.352,-2.842 -1.553,-2.758 -1.746,-2.658 -1.929,-2.541 -2.102,-2.409 -2.262,-2.262 -2.409,-2.102 -2.541,-1.929 -2.658,-1.746 -2.758,-1.553 -2.842,-1.352 -2.907,-1.145 -2.954,-0.933 -2.982,-0.717 -2.991,-0.516 -2.99,-0.5 -2.999,-0.4 -3.015,-0.35 -3.015,49.5 -3.016,49.516 -3.007,49.717 -2.979,49.933 -2.932,50.145 -2.867,50.352 -2.783,50.553 -2.683,50.746 -2.566,50.929 -2.434,51.102 -2.287,51.262 -2.127,51.409 -1.954,51.541 -1.771,51.658 -1.578,51.758 -1.377,51.842 -1.17,51.907 -0.958,51.954 -0.742,51.982 -0.541,51.991 -0.525,51.99 78.475,51.99 78.575,51.999 78.612,52.011

## Silkscreen, mask and mechanical layers (free items; w line width, h text height)
Top Overlay:
  text "Horgos Raul George" at 56.825,5.192 h0.5
  text "TIE2025" at 61.4,3.5 h0.5
Board Shape:
  lines w0.254: 78.475,52.5 -0.525,52.5 ccw(c-0.525,49.5) -3.525,49.5 -3.525,-0.5 -3.5,-0.5 ccw(c-0.5,-0.5) -0.5,-3.5 ; 78.475,52.525 cw(c78.475,49.525) 81.475,49.525 ; -0.5,-3.5 78.475,-3.5 ccw(c78.475,-0.5) 81.475,-0.5 81.475,49.525 ; -0.5,-3.5 -0.5,-3.5 ; 81.475,49.525 81.475,49.525